# Altium PCB Tester_componete_PCB.PcbDoc
Units mm, origin at the board's own origin, x right, y up, seen from the top; angles counter-clockwise.
Board outline 100 x 100 mm, 2 copper layers (Top Layer, Bottom Layer); 61 components, 39 nets, 186 pads, 0 vias.
Unrouted connection lines stored in the file: 140.
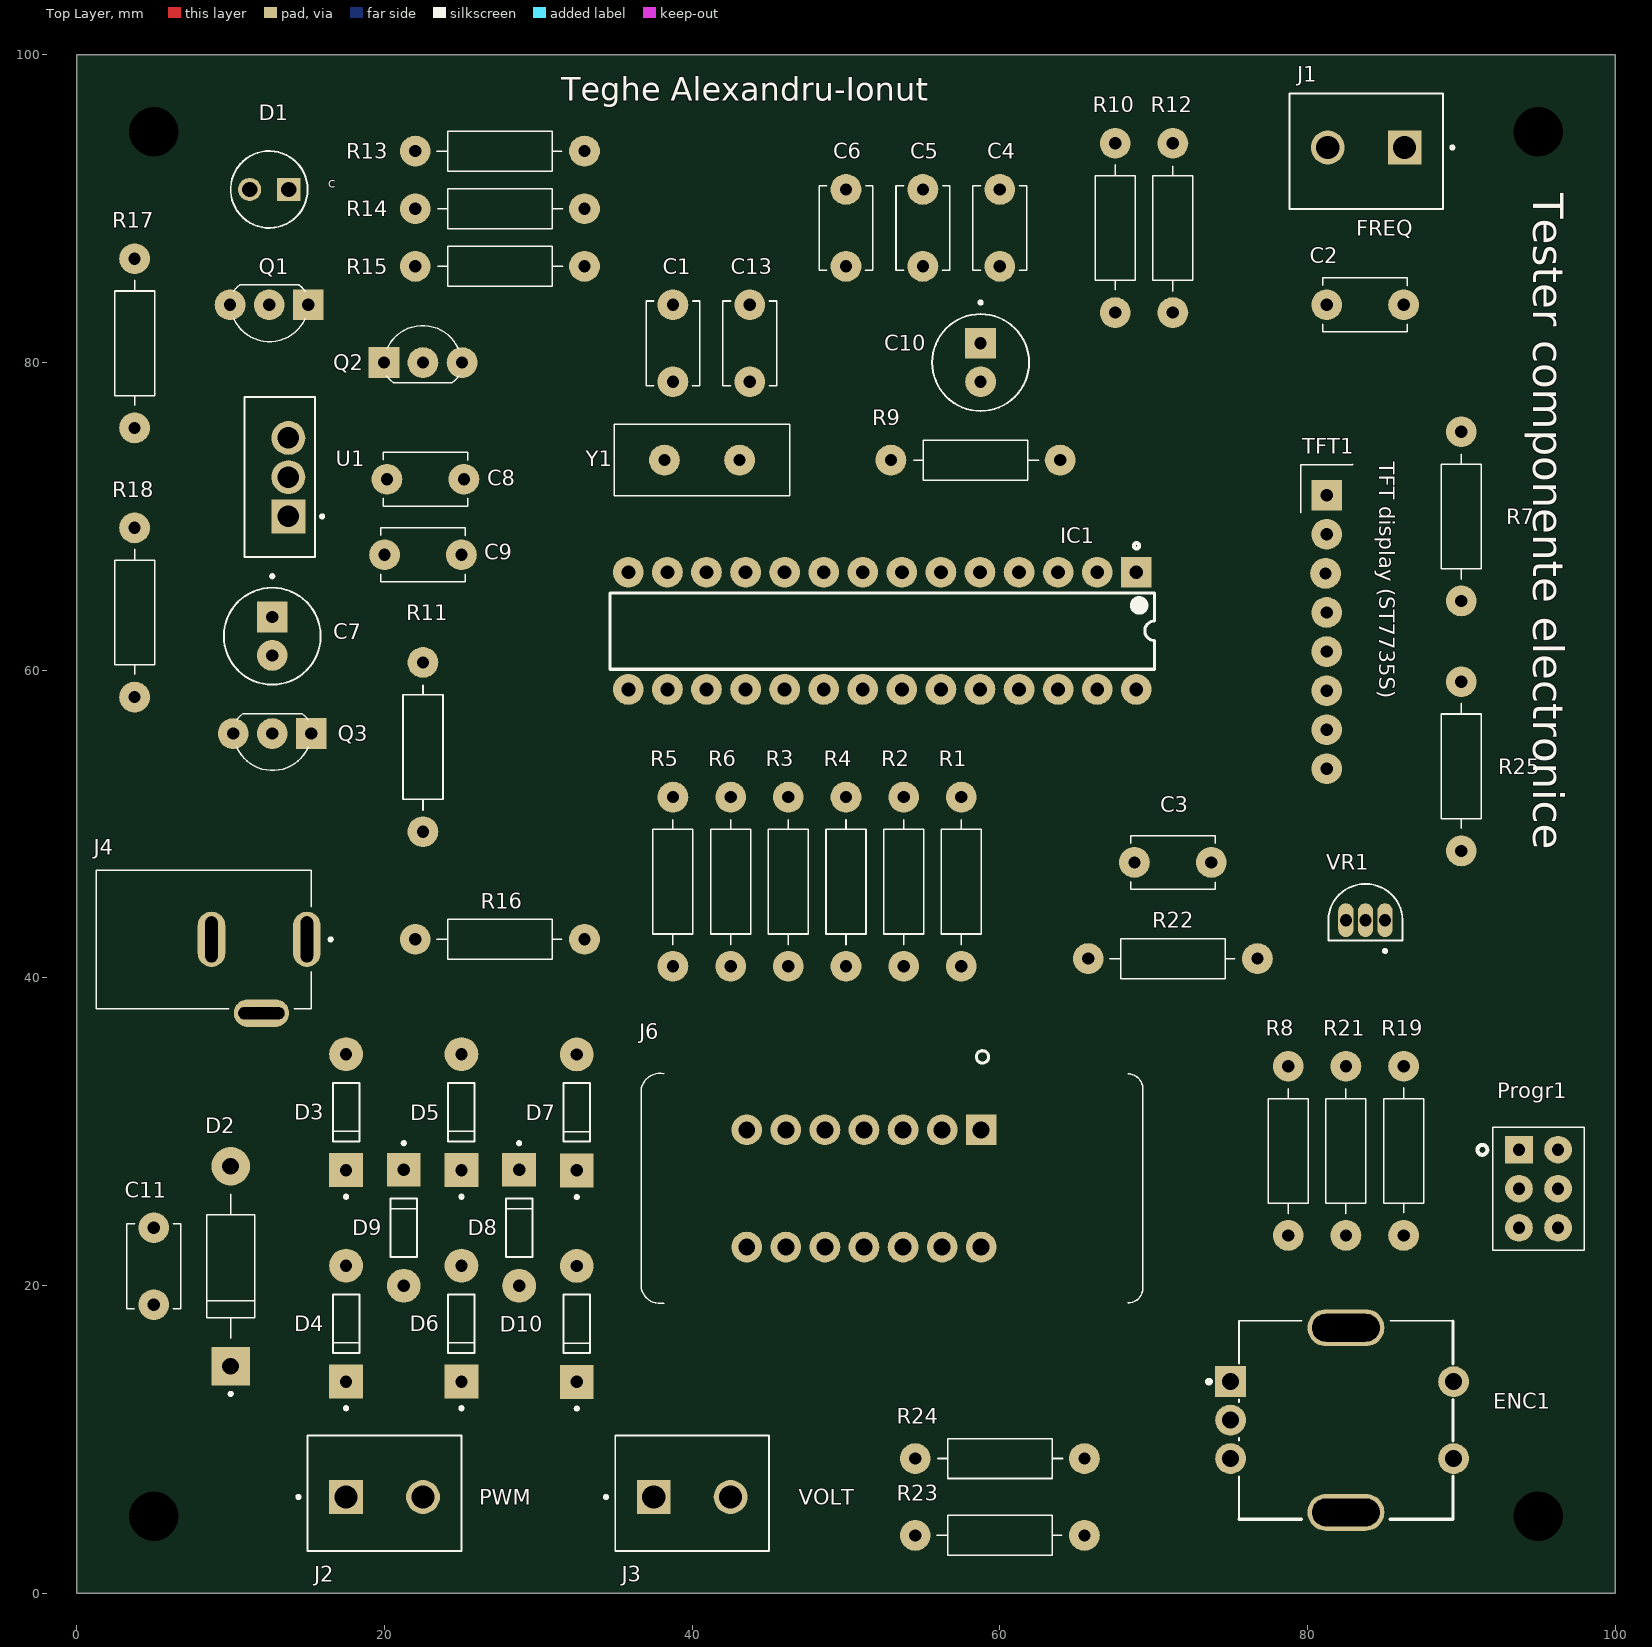
[diagram p0: Top Layer view]
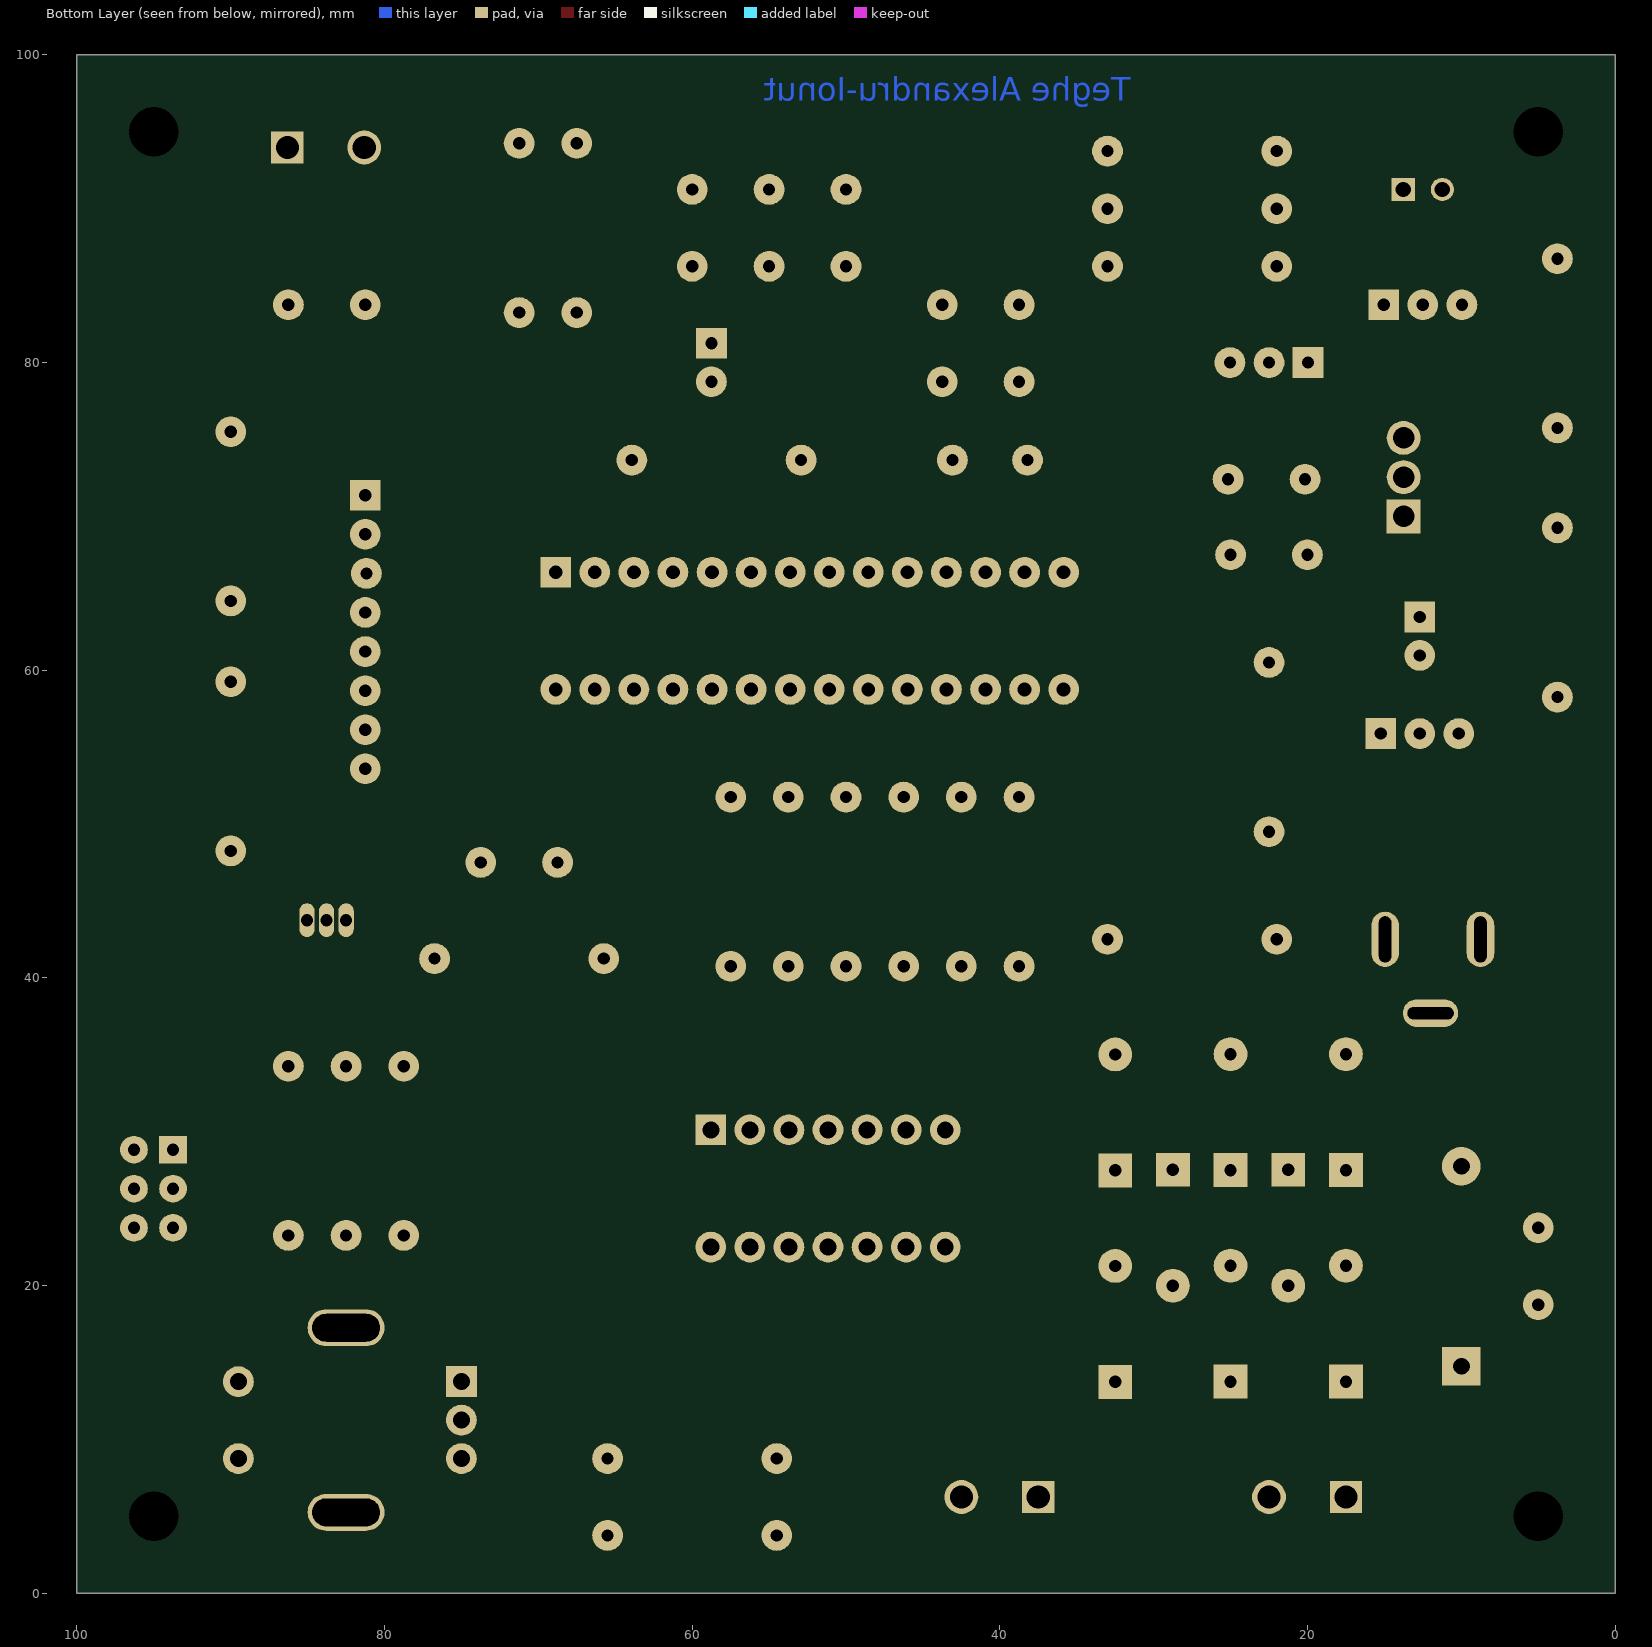
[diagram p1: Bottom Layer view, seen from below]

## Layer stack, top to bottom
Top Solder: solder mask 0.0102, Solder Resist, Dk 3.5
Top Layer: signal copper 0.0356
Dielectric 1: dielectric 0.32, FR-4, Dk 4.8
Bottom Layer: signal copper 0.0356
Bottom Solder: solder mask 0.0102, Solder Resist, Dk 3.5

## Board outline
0,0 0,100 100,100 100,0

## Design rules (kind name [scope] priority, off if disabled: settings)
Clearance [All] p1: gap=0.254 ignorepadtopadclearanceinfootprint=FALSE
PolygonConnect [All] p1: connectstyle=Relief reliefconductorwidth=0.254 reliefentries=4 polygonreliefangle="90 Angle" airgapwidth=0.254
RoutingPriority [OnLayer('Bottom Layer')] p1: routingpriority=0
RoutingVias [All] p1: holewidth=0.8 width=1.27 viastyle="Through Hole" minholewidth=0.8 minwidth=1.27 maxholewidth=0.8 maxwidth=1.27
SolderMaskExpansion [All] p1: expansion=0.102 istentingtop=FALSE
SupplyNets "Schematic Supply Nets_1" [InNet('VCC')] p1: voltage=0.000
SupplyNets "Schematic Supply Nets" [InNet('GND')] p2: voltage=0.000
Width [InNet('No Net')] p1: maxlimit=0.254 minlimit=0.254 preferedwidth=0.254
29 further rules are at their usual default settings.

## Components (designator, comment, footprint, x,y, rotation, side; value= is the part's Value field where it differs from the comment)
C1 "C" FP_CAP 38.75,81.25 r270 top value=22pF
C2 "C_2" FP_CAP 83.75,83.75 r0 top value=100nF
C3 "C_1" FP_CAP 71.25,47.5 r180 top value=1nF
C4 "C_2" FP_CAP 60,88.75 r270 top value=100nF
C5 "C_2" FP_CAP 55,88.75 r270 top value=100nF
C6 "C_1" FP_CAP 50,88.75 r270 top value=10nF
C7 "10uF/25V" FP_CAP_ELEC_10uF 12.7,62.21 r270 top
C8 "C_2" FP_CAP 22.66,72.41 r0 top value=100nF
C9 "C_2" FP_CAP 22.5,67.5 r0 top value=100nF
C10 "10uF/25V" FP_CAP_ELEC_10uF 58.75,80 r270 top
C11 "C_2" FP_CAP 5,21.25 r90 top value=100nF
C13 "C" FP_CAP 43.75,81.25 r270 top value=22pF
D1 "LED" FP_LED 12.5,91.25 r180 top
D2 "DIODA_P6KE62CA-DIO" FP_P6KE62CA-DIO_DO15 10,21.25 r90 top
D3 "1N4148" FP_1N4148_DO35 17.5,31.268 r90 top
D4 "1N4148" FP_1N4148_DO35 17.5,17.518 r90 top
D5 "1N4148" FP_1N4148_DO35 25,31.268 r90 top
D6 "1N4148" FP_1N4148_DO35 25,17.518 r90 top
D7 "1N4148" FP_1N4148_DO35 32.5,31.25 r90 top
D8 "1N4148" FP_1N4148_DO35 32.5,17.5 r90 top
D9 "1N4148" FP_1N4148_DO35 21.25,23.75 r270 top
D10 "1N4148" FP_1N4148_DO35 28.75,23.75 r270 top
ENC1 "PEC16-4115F-S0012" FP-ENCODER 82.5,11.25 r270 top
IC1 "ATmega328-PU" FP_ATMEGA328_DIP28P3 52.36,62.56 r270 top
J1 "FREQ" FP_CON-2P 83.82,93.98 r180 top
J2 "PWM" FP_CON-2P 20,6.25 r0 top
J3 "VOLT" FP_CON-2P 40,6.25 r0 top
J4 "DC POWER JACK" FP_DC_JACK 14.95,42.5 r270 top
J6 "ZIF14" FP_CONNZIF14 51.17,26.31 r270 top
Progr1 "CON6_ARDUINO" FP_CON2X3PINI_2,54 93.75,28.83 r0 top
Q1 "BC547B" FP_BC547_TO-92_CBE 12.5,83.75 r180 top
Q2 "BC547B" FP_BC547_TO-92_CBE 22.5,80 r0 top
Q3 "BC327-25" FP_BC327-25_TO-92_CBE 12.7,55.88 r180 top
R1 "R_7" FP_REZ 57.5,46.25 r270 top value=470K
R2 "R_6" FP_REZ 53.75,46.25 r270 top value=680
R3 "R_6" FP_REZ 46.25,46.25 r270 top value=680
R4 "R_7" FP_REZ 50,46.25 r270 top value=470K
R5 "R_6" FP_REZ 38.75,46.25 r270 top value=680
R6 "R_7" FP_REZ 42.5,46.25 r270 top value=470K
R7 "R_11" FP_REZ 90,70 r270 top value=220
R8 "R_1" FP_REZ 78.75,28.75 r270 top value=1K
R9 "R_2" FP_REZ 58.42,73.66 r0 top value=10K
R10 "R_2" FP_REZ 67.5,88.75 r90 top value=10K
R11 "R_5" FP_REZ 22.5,55 r270 top value=3,3K
R12 "R_2" FP_REZ 71.25,88.75 r270 top value=10K
R13 "R" FP_REZ 27.5,93.75 r180 top value=100K
R14 "R_3" FP_REZ 27.5,90 r0 top value=27K
R15 "R_3" FP_REZ 27.5,86.25 r0 top value=27K
R16 "R_2" FP_REZ 27.5,42.5 r180 top value=10K
R17 "3K3" FP_REZ 3.75,81.25 r90 top
R18 "33K" FP_REZ 3.75,63.75 r90 top
R19 "R_2" FP_REZ 86.25,28.75 r90 top value=10K
R21 "R_2" FP_REZ 82.5,28.75 r270 top value=10K
R22 "R_4" FP_REZ 71.25,41.25 r180 top value=2,2K
R23 "R_10" FP_REZ 60,3.75 r180 top value=180K
R24 "R_9" FP_REZ 60,8.75 r0 top value=20K
R25 "R_1" FP_REZ 90,53.75 r90 top value=1K
TFT1 "TFT display (ST7735S)" FP_CON_8PINI_DISPLAY 81.25,71.37 r270 top
U1 "L7805" FP_L7805_TO220 13.75,70 r90 top
VR1 "TL431AILPR" FP_VREG_TL431AILPR 83.77,43.75 r0 top
Y1 "NX3225GA-16.000M-STD-CRG-2" Cristal_16.00MHz 40.64,73.66 r0 top

## Footprints (in the part's own frame and the unit in brackets; to place one, negate y for a bottom-side part, rotate by r counter-clockwise, add the part's x,y. Pads: shape width x height; smd on the part's side, far side on the other; paste and mask are expansions set on the pad)
Cristal_16.00MHz [mm] "Cristal;16MHz;THT;20pF;±30ppm;±5ppm/an;1mW;4,88mm / Producator: YIC; Simbol producator: 16.00M-HC49-S; Conformitate / RoHS"
  round 2 hole 0.8 mask+0.1: 1(-2.44,0) 2(2.44,0)
  silkscreen extent -5.7,-2.32 5.7,2.33
FP-ENCODER [mm]
  rect 2x2 hole 1.1 paste-2539.97 mask+0.1: 1(-2.5,-7.5)
  round 2 hole 1.1 paste-2539.97 mask+0.1: 2(0,-7.5) 3(2.5,-7.5) S1(-2.5,7) S2(2.5,7)
  rrect100% 2.4x5 hole 4.4 slot 1.8 at 0 deg paste-2539.97 mask+0: MNT1(-6,0) MNT2(6,0)
  silkscreen extent -6.45,-9.02 6.45,6.95, body extent -7,-8.37 7,7.88, height 0.25
FP_1N4148_DO35 [mm]
  round 2.2 hole 0.8 mask+0.102: A(3.769,0)
  rect 2.2x2.2 / inner round 2.2 / far side rect 2.2x2.2 hole 0.8 mask+0.102: K(-3.768,0)
  silkscreen extent -5.6,-0.86 1.9,0.86
FP_ATMEGA328_DIP28P3 [mm] "28-Pin Plastic Dual In-Line Package (PDIP)"
  rect 2x2 hole 0.9: 1(-3.81,16.51)
  round 2 hole 0.9: 2(-3.81,13.97) 3(-3.81,11.43) 4(-3.81,8.89) 5(-3.81,6.35) 6(-3.81,3.81) 7(-3.81,1.27) 8(-3.81,-1.27) 9(-3.81,-3.81) 10(-3.81,-6.35) 11(-3.81,-8.89) 12(-3.81,-11.43) 13(-3.81,-13.97) 14(-3.81,-16.51) 15(3.81,-16.51) 16(3.81,-13.97) 17(3.81,-11.43) 18(3.81,-8.89) 19(3.81,-6.35) 20(3.81,-3.81) 21(3.81,-1.27) 22(3.81,1.27) 23(3.81,3.81) 24(3.81,6.35) 25(3.81,8.89) 26(3.81,11.43) 27(3.81,13.97) 28(3.81,16.51)
  silkscreen extent -5.7,-17.7 2.5,17.7, body extent -3.6,-17.65 3.6,17.65, height 4.58
FP_BC327-25_TO-92_CBE [mm]
  rect 2x2 hole 0.8: 1(-2.54,0)
  round 2 hole 0.8: 2(0,0) 3(2.54,0)
  silkscreen extent -2.34,-1.3 2.32,2.4, body extent -2.74,-1.28 2.74,2.32, height 8.6
FP_BC547_TO-92_CBE [mm]
  rect 2x2 hole 0.8: 1(-2.54,0)
  round 2 hole 0.8: 2(0,0) 3(2.54,0)
  silkscreen extent -2.34,-1.3 2.32,2.4, body extent -2.74,-1.28 2.74,2.32, height 8.6
FP_CAP [mm]
  round 2 hole 0.8: 1(-2.5,0) 2(2.5,0)
  silkscreen extent -2.75,-1.75 2.75,1.75, body extent -2.75,-1.75 2.75,1.75, height 6
FP_CAP_ELEC_10uF [mm]
  rect 2x2 hole 0.8: 1(-1.25,0)
  round 2 hole 0.8: 2(1.25,0)
  silkscreen extent -4,-3.15 3.15,3.15, body extent -3.15,-3.15 3.15,3.15, height 11.2
FP_CON2X3PINI_2,54 [mm]
  rect 1.8x1.8 hole 0.8 mask+0.05: 1(0,0)
  round 1.8 hole 0.8 mask+0.05: 2(2.54,0) 3(0,-2.54) 4(2.54,-2.54) 5(0,-5.08) 6(2.54,-5.08)
  silkscreen extent -2.7,-6.53 4.23,1.45
FP_CON-2P [mm]
  rect 2.2x2.2 / inner round 2.1 / far side rect 2.1x2.1 hole 1.5: 1(-2.5,0)
  round 2.2 hole 1.5: 2(2.5,0)
  silkscreen extent -5.7,-3.5 5,4, body extent -5.6,-3.75 5,3.75, height 10
FP_CON_8PINI_DISPLAY [mm]
  rect 2x2 hole 0.8 mask+0.05: 1(0,0)
  round 2 hole 0.8 mask+0.05: 2(2.54,0) 3(5.08,-0.075) 4(7.62,0) 5(10.16,0) 6(12.7,0) 7(15.24,0) 8(17.78,0)
  silkscreen extent -2,-1.7 1.12,1.7
FP_CONNZIF14 [mm]
  rect 2x2 hole 1.1: 1(-3.81,7.62)
  round 2 hole 1.1: 2(-3.81,5.08) 3(-3.81,2.54) 4(-3.81,0) 5(-3.81,-2.54) 6(-3.81,-5.08) 7(-3.81,-7.62) 8(3.81,-7.62) 9(3.81,-5.08) 10(3.81,-2.54) 11(3.81,0) 12(3.81,2.54) 13(3.81,5.08) 14(3.81,7.62)
  silkscreen extent -8.95,-14.48 7.48,18.12
FP_DC_JACK [mm]
  oval 3.6x1.8 hole 0.8 slot 3 at 0 deg mask+0.102: 1(0,0) 2(0,-6.2)
  oval 1.8x3.6 hole 0.8 slot 3 at 90 deg mask+0.102: 3(4.8,-2.95)
  silkscreen extent -4.5,-13.7 4.5,1.65, body extent -4.85,-13.37 4.6,0.67, height 4.5
FP_L7805_TO220 [mm]
  rect 2.2x2.2 / inner round 2.2 / far side rect 2.2x2.2 hole 1.4: 1(0,0)
  round 2.2 hole 1.4: 2(2.55,0) 3(5.1,0)
  silkscreen extent -2.65,-2.29 7.75,2.86, body extent -2.54,-1.74 7.66,2.76, height 19.68
FP_LED [mm]
  round 1.508 hole 1: A(1.27,0)
  rect 1.508x1.508 / inner round 1.508 / far side rect 1.508x1.508 hole 1: C(-1.27,0)
  silkscreen extent -2.5,-2.5 2.5,2.5, body extent -2.5,-2.95 2.95,2.95, height 9.6
FP_P6KE62CA-DIO_DO15 [mm]
  round 2.5 hole 1.1 mask+0.102: A(6.5,0)
  rect 2.5x2.5 / inner round 2.5 / far side rect 2.5x2.5 hole 1.1 mask+0.102: C(-6.5,0)
  silkscreen extent -8.4,-1.55 4.67,1.55, body extent -6.9,-1.8 6.9,1.8, height 3.6
FP_REZ [mm]
  round 2 hole 0.8: 1(-5.5,0) 2(5.5,0)
  silkscreen extent -4.03,-1.3 4.1,1.3, body extent -5.77,-1.2 5.77,1.2, height 2.4
FP_VREG_TL431AILPR [mm]
  oval 1x2.2 hole 0.8 mask+0.05: 1(1.27,0) 2(0,0) 3(-1.27,0)
  silkscreen extent -2.41,-2.1 2.41,2.35

## Part data
C1 C13: "Condensator:ceramic;22pF;1kV;C0G (NP0);±5%;THT;5mm / Producator: SR PASSIVES; Simbol producator: / CC2220JNPO1KVB5LS-LF", Package="Radial TDK", Check_prices=https://www.snapeda.com/parts/FG26C0G2J182JNT06/TDK/view-part/?ref=eda, MF=TDK, MP=FG26C0G2J182JNT06, SnapEDA_Link=https://www.snapeda.com/parts/FG26C0G2J182JNT06/TDK/view-part/?ref=snap
C2 C4 C5 C8 C9 C11: "Condensator:ceramic;100nF;50V;X7R;±10%;THT;2,5mm / Producator: VISHAY; Simbol producator: K104K10X7RF5UL2; / Conformitate RoHS", Package="Radial TDK", Check_prices=https://www.snapeda.com/parts/FG26C0G2J182JNT06/TDK/view-part/?ref=eda, MF=TDK, MP=FG26C0G2J182JNT06, SnapEDA_Link=https://www.snapeda.com/parts/FG26C0G2J182JNT06/TDK/view-part/?ref=snap
C3 C6: "Condensator:ceramic;1nF;1kV;Y5P;±10%;THT;5mm / Producator: SR PASSIVES; Simbol producator: CCH-1N/1000V; / Conformitate RoHS", Package="Radial TDK", Check_prices=https://www.snapeda.com/parts/FG26C0G2J182JNT06/TDK/view-part/?ref=eda, MF=TDK, MP=FG26C0G2J182JNT06, SnapEDA_Link=https://www.snapeda.com/parts/FG26C0G2J182JNT06/TDK/view-part/?ref=snap
C7 C10: library part Cap_elec_10uF, "Aluminum Electrolytic Capacitors 10uF", Capacitance=1µF, Case/Package=Radial, ESR (Equivalent Series Resistance)=39.553Ω, Leakage Current=3µA, Max Operating Temperature=105°C, Min Operating Temperature=-40°C, Ripple Current=13mA, Tolerance=20%, Voltage Rating=50V, Diameter=5mm, Height=11mm, Height - Seated (Max)=12.4968mm, Hole Diameter=800µm, Lead Pitch=2.0066mm, Length=11mm, Life (Hours)=2000hours, Mount="Through Hole", NexarPartId=53914228, Packaging="Tape & Box (TB)", Pitch=2mm, Polarity=Polar, REACH SVHC=Unknown, RoHS=Compliant, Voltage Rating (DC)=50V
D1: "Green 568nm LED Indication - Discrete 2.2V Radial", Package="Radial Kingbright", Check_prices=https://www.snapeda.com/parts/WP7113SGD/Kingbright/view-part/?ref=eda, MF=Kingbright, MP=WP7113SGD, SnapEDA_Link=https://www.snapeda.com/parts/WP7113SGD/Kingbright/view-part/?ref=snap
D2: "Dioda:TVS;62V;bidirectionala;±5%;DO15;Ammo Pack;600W;P6KE / Producator: DIOTEC SEMICONDUCTOR; Simbol producator: / P6KE62CA; Conformitate RoHS", Package="DO-15 Taiwan Semiconductor", Check_prices=https://www.snapeda.com/parts/P6KE62CAH/taiwan/view-part/?ref=eda, MF="Taiwan Semiconductor", MP=P6KE62CAH, SnapEDA_Link=https://www.snapeda.com/parts/P6KE62CAH/taiwan/view-part/?ref=snap
D3 D4 D5 D6 D7 D8 D9 D10: "Diode Standard 100 V 200mA Through Hole DO-35", Package="AXIAL LEAD-2 ON Semiconductor", Check_prices=https://www.snapeda.com/parts/1N4148TA/Onsemi/view-part/?ref=eda, MF="ON Semiconductor", MP=1N4148TA, SnapEDA_Link=https://www.snapeda.com/parts/1N4148TA/Onsemi/view-part/?ref=snap
ENC1: library part Encoder_rotativ, "Encoder rotativ cu click 20mm EC11", Max Operating Temperature=70°C, Min Operating Temperature=-30°C, Operating Supply Voltage=5V, Package Quantity=50, Built in Switch=Yes, Detent=Yes, Encoder Type=Mechanical, Height=17.3mm, Length=23mm, Mount="Through Hole", Number of Channels=2, Orientation=Vertical, Output Type=Quadrature, Pulses per Revolution=12, RoHS Compliant=Yes, Series=PEC16, Termination="PC Pin", Width=16mm
IC1: "8-bit AVR Microcontroller, 32KB Flash, 1KB EEPROM, 2KB SRAM, 28-pin PDIP, Industrial Grade (-40°C to 85°C)", ComponentLink1Description="Manufacturer URL", ComponentLink1URL=http://www.atmel.com/, ComponentLink2Description="ATmega48A/48PA/88A/88PA/168A/168PA/328/328P Datasheet", ComponentLink2URL=http://www.atmel.com/dyn/resources/prod_documents/8271.pdf, ComponentLink3Description="ATmega48A/48PA/88A/88PA/168A/168PA/328/328P Summary", ComponentLink3URL=http://www.atmel.com/dyn/resources/prod_documents/8271S.pdf, DatasheetVersion="revD, May-2011", PackageDescription="28-lead (0.300\"/7.62mm Wide) Plastic Dual Inline Package (PDIP)", PackageReference=28P3, PackageVersion="revB, Sep-2001", RevisionNote="DatasheetVersion updated. URLs added."
J1 J2 J3: library part CON2-KF301, "2 Pin Terminal Block 5mm Pitch", Package=None, Check_prices=https://www.snapeda.com/parts/KF301-2P/Handson+Technology/view-part/?ref=eda, MF="Handson Technology", MP=KF301-2P, SnapEDA_Link=https://www.snapeda.com/parts/KF301-2P/Handson+Technology/view-part/?ref=snap
J4: "Power Barrel Connector Jack 1.30mm ID (0.051), 3.50mm OD (0.138) Through Hole, Right Angle", Package=None, Check_prices=https://www.snapeda.com/parts/PJ035D/Same+Sky/view-part/?ref=eda, MF="Same Sky", MP=PJ035D, SnapEDA_Link=https://www.snapeda.com/parts/PJ035D/Same+Sky/view-part/?ref=snap
J6: "Socket: DIP; ZIF; PIN: 14; 7.62mm; demountable; -40Ã·105Â°C; THT; 50VDC", Package=None, Availability=Unavailable, MF=Connfly, MP=DS1044-140G, Price=None, SnapEDA_Link=https://www.snapeda.com/parts/DS1044-140G/Connfly/view-part/524362/?ref=snap
Progr1 TFT1: "Display Color 1.8 inch, TFT LCD"
Q1 Q2: library part BC547-DIO, "Tranzistor:NPN;bipolar;45V;0,1A;500mW;TO92 / Producator: DIOTEC SEMICONDUCTOR; Simbol producator: / BC547B; Conformitate RoHS", Current - Collector (Ic) (Max)=800mA, Current - Collector Cutoff (Max)=50nA, DC Current Gain (hFE) (Min) @ Ic, Vce=75@1mA,10V, Frequency - Transition=-, Manufacturer="TT Electronics", Package / Case=4-CLCC, Package Description="4-Pin Leadless Chip Carrier, Body 5.59 x 3.81 mm, Pitch 1.27 mm", Package Reference=MO-041BA, Power - Max=500mW, Standard Package=1, Supplier Device Package=CeramicSMD, Voltage - Collector Emitter Breakdown (Max)=50V, Category=DiscreteSemiconductorProducts, Datasheet URL=http://www.ttelectronics.com/themes/ttelectronics/datasheets/semiconductors/transistors/2N2222AUA.pdf, Datasheet Version=08/2012, Family=Transistors(BJT)-Single, Manufacturer URL=http://www.ttelectronics.com/, Mounting Technology=SurfaceMount, Mounting Type=SurfaceMount, Online Catalog=NPNTransistors, Other Names=2N2222AUA-ND365-1563, Packaging=Bulk, PCN Design/Specification=TransistorDieChange20/Jun/2014, Series=-, Transistor Type=NPN, Vce Saturation (Max) @ Ib, Ic=1V@50mA,500mA
Q3: "Tranzistor:PNP;bipolar;45V;0,8A;625mW;TO92 / Producator: DIOTEC SEMICONDUCTOR; Simbol producator: / BC327-25; Conformitate RoHS", Current - Collector (Ic) (Max)=800mA, Current - Collector Cutoff (Max)=50nA, DC Current Gain (hFE) (Min) @ Ic, Vce=75@1mA,10V, Frequency - Transition=-, Manufacturer="TT Electronics", Package / Case=4-CLCC, Package Description="4-Pin Leadless Chip Carrier, Body 5.59 x 3.81 mm, Pitch 1.27 mm", Package Reference=MO-041BA, Power - Max=500mW, Standard Package=1, Supplier Device Package=CeramicSMD, Voltage - Collector Emitter Breakdown (Max)=50V, Category=DiscreteSemiconductorProducts, Datasheet URL=http://www.ttelectronics.com/themes/ttelectronics/datasheets/semiconductors/transistors/2N2222AUA.pdf, Datasheet Version=08/2012, Family=Transistors(BJT)-Single, Manufacturer URL=http://www.ttelectronics.com/, Mounting Technology=SurfaceMount, Mounting Type=SurfaceMount, Online Catalog=NPNTransistors, Other Names=2N2222AUA-ND365-1563, Packaging=Bulk, PCN Design/Specification=TransistorDieChange20/Jun/2014, Series=-, Transistor Type=NPN, Vce Saturation (Max) @ Ib, Ic=1V@50mA,500mA
R1 R4 R6: "470K REZISTOR, 1%, 0.6W"
R2 R3 R5: "680Ohm REZISTOR, 1%, 0.6W"
R7: "220Ohm REZISTOR, 1%, 0.6W"
R8 R25: "1K REZISTOR, 1%, 0.6W"
R9 R10 R12 R16 R19 R21: "10K REZISTOR, 1%, 0.6W"
R11: "3K3K REZISTOR, 1%, 0.6W"
R13: "100K REZISTOR, 1%, 0.6W"
R14 R15: "27K REZISTOR, 1%, 0.6W"
R17: library part R_5, "3K3K REZISTOR, 1%, 0.6W"
R18: library part R_8, "33K REZISTOR, 1%, 0.6W"
R22: "2K2K REZISTOR, 1%, 0.6W"
R23: "180K REZISTOR, 1%, 0.6W"
R24: "20K REZISTOR, 1%, 0.6W"
U1: "Linear Voltage Regulator IC Positive Fixed 1 Output 1.5A TO-220", Code_IPC=SOT89, DatasheetVersion="Rev1.80, Mar-2010", PackageDescription="3-Pin SOT-89 Package 1.5 mm Pitch, 4.1 mm Lead Span", PackageReference=SOT89, PackageVersion=May-2010
VR1: "IC:Sursa tensiune de referinta;2,495V;±1%;TO92;rola;100mA / Producator: TEXAS INSTRUMENTS; Simbol producator: / TL431AILPR; Conformitate RoHS", Package=None, Availability=Unavailable, MF="{'manufacturer': u'Texas Instruments'}", MP=TL431AILPR, Price=None
Y1: library part "16MHZ Cristal cuartz", "CRYSTAL 16.0000MHZ 8PF SMD", Case/Package=SMD/SMT, ESR (Equivalent Series Resistance)=80R, Frequency=16MHz, Frequency Stability=30ppm, Frequency Tolerance=20ppm, Load Capacitance=8pF, Max Operating Temperature=85°C, Min Operating Temperature=-40°C, Package Quantity=3000, Height=0.035inch, Length=0.126inch, Mount="Surface Mount", Number of Pins=4, Packaging="Tape and Reel", Width=0.098inch

## Free pads (board coordinates)
  rect 0.52x0.52 hole 3.2 unplated mask+0.05: MH(5,5) MH(5,95) MH(95,5) MH(95,95) MH(172.72,-76.2)

## Nets (pads, with @x,y where several pads share a name; then routed paths per layer and width w, separated by ;. In a path a pad name is that pad's centre, name@x,y a point inside that pad or via, vN(x,y) a via of type N, cw(c..) or ccw(c..) an arc to the next point about the centre after c; other vN are vias at no path point)
GND: C1.2 C3.1 C4.1 C5.1 C6.1 C7.2 C8.1 C9.1 C10.2 C11.2 C13.2 D2.A D4.K D6.K D8.K ENC1.2 IC1.8 IC1.22 J1.2 J2.2 J3.2 J4.2 J4.3 Progr1.6 Q1.3 Q2.3 R11.1 R12.1 R13.1 R24.1 TFT1.1 U1.2 VR1.2
NetC1_1: C1.1 IC1.10 Y1.1
NetC2_1: C2.1 R10.1 R12.2
NetC2_2: C2.2 J1.1
NetC3_2: C3.2 IC1.21
NetC6_2: C6.2 Q1.2 R13.2 R15.1
NetC7_1: C7.1 C9.2 Q3.1 R16.1 U1.1
NetC13_1: C13.1 IC1.9 Y1.2
NetD1_A: D1.A ENC1.S1 R17.1
NetD1_C: D1.C Q1.1
NetENC1_1: ENC1.1 R19.1 R25.1
NetENC1_3: ENC1.3 R8.1 R21.1
NetENC1_S2: ENC1.S2 Q2.2
NetIC1_1: IC1.1 Progr1.5 R9.2
NetIC1_2: IC1.2 TFT1.5
NetIC1_3: IC1.3 R25.2 TFT1.6
NetIC1_4: IC1.4 TFT1.3
NetIC1_5: IC1.5 R8.2 TFT1.4
NetIC1_6: IC1.6
NetIC1_11: IC1.11 TFT1.7
NetIC1_12: IC1.12 R15.2
NetIC1_13: IC1.13 Q2.1 R14.1
NetIC1_14: IC1.14 R5.1
NetIC1_15: IC1.15 R6.1
NetIC1_16: IC1.16 R3.1
NetIC1_17: IC1.17 Progr1.4 R4.1
NetIC1_18: IC1.18 Progr1.1 R2.1
NetIC1_19: IC1.19 Progr1.3 R1.1
NetIC1_26: IC1.26 R23.1 R24.2
NetIC1_27: IC1.27 R22.1 VR1.1 VR1.3
NetIC1_28: IC1.28 R11.2 R16.2
NetJ3_1: J3.1 R23.2
NetJ4_1: J4.1 Q3.3 R18.1
NetQ3_2: Q3.2 R17.2 R18.2
NetR7_2: R7.2 TFT1.8
TP1: D3.K D4.A D9.A IC1.25 J6.1 J6.2 J6.3 J6.12 J6.13 J6.14 R1.2 R2.2
TP2: D5.K D6.A D9.K D10.A IC1.24 J2.1 J6.4 J6.11 R3.2 R4.2
TP3: D7.K D8.A D10.K IC1.23 J6.5 J6.6 J6.7 J6.8 J6.9 J6.10 R5.2 R6.2
VCC: C4.2 C5.2 C8.2 C10.1 C11.1 D2.C D3.A D5.A D7.A IC1.7 IC1.20 Progr1.2 R7.1 R9.1 R10.2 R14.2 R19.2 R21.2 R22.2 TFT1.2 U1.3
pads on no net: ENC1.MNT1 ENC1.MNT2

## Other copper
Bottom Layer:
  text "Teghe Alexandru-Ionut" at 31.504,97.012 h1.52

## Silkscreen, mask and mechanical layers (free items; w line width, h text height)
Top Overlay:
  text "Teghe Alexandru-Ionut" at 31.504,97.012 h1.52
  text "Tester componente electronice" at 94.67,90.996 h2 r270
Board shape:
  the board outline again, w0.1

## Text inside footprints (layer, text, board x,y; h text height)
D1: Top Overlay "C" at 16.35,91.35 h0.5